# Altium PCB PCB-Powermodule-v11.0.0.PcbDoc (part 3 of 5)
Units mil, origin at the board's own origin, x right, y up, seen from the top; angles counter-clockwise.
Board outline 3031.5 x 1495.87 mil, 4 copper layers (Top Layer, Ground, Power, Bottom Layer), stack 61.653 mil thick; 227 components, 160 nets, 893 pads, 326 vias.
Unrouted connection lines stored in the file: 45.
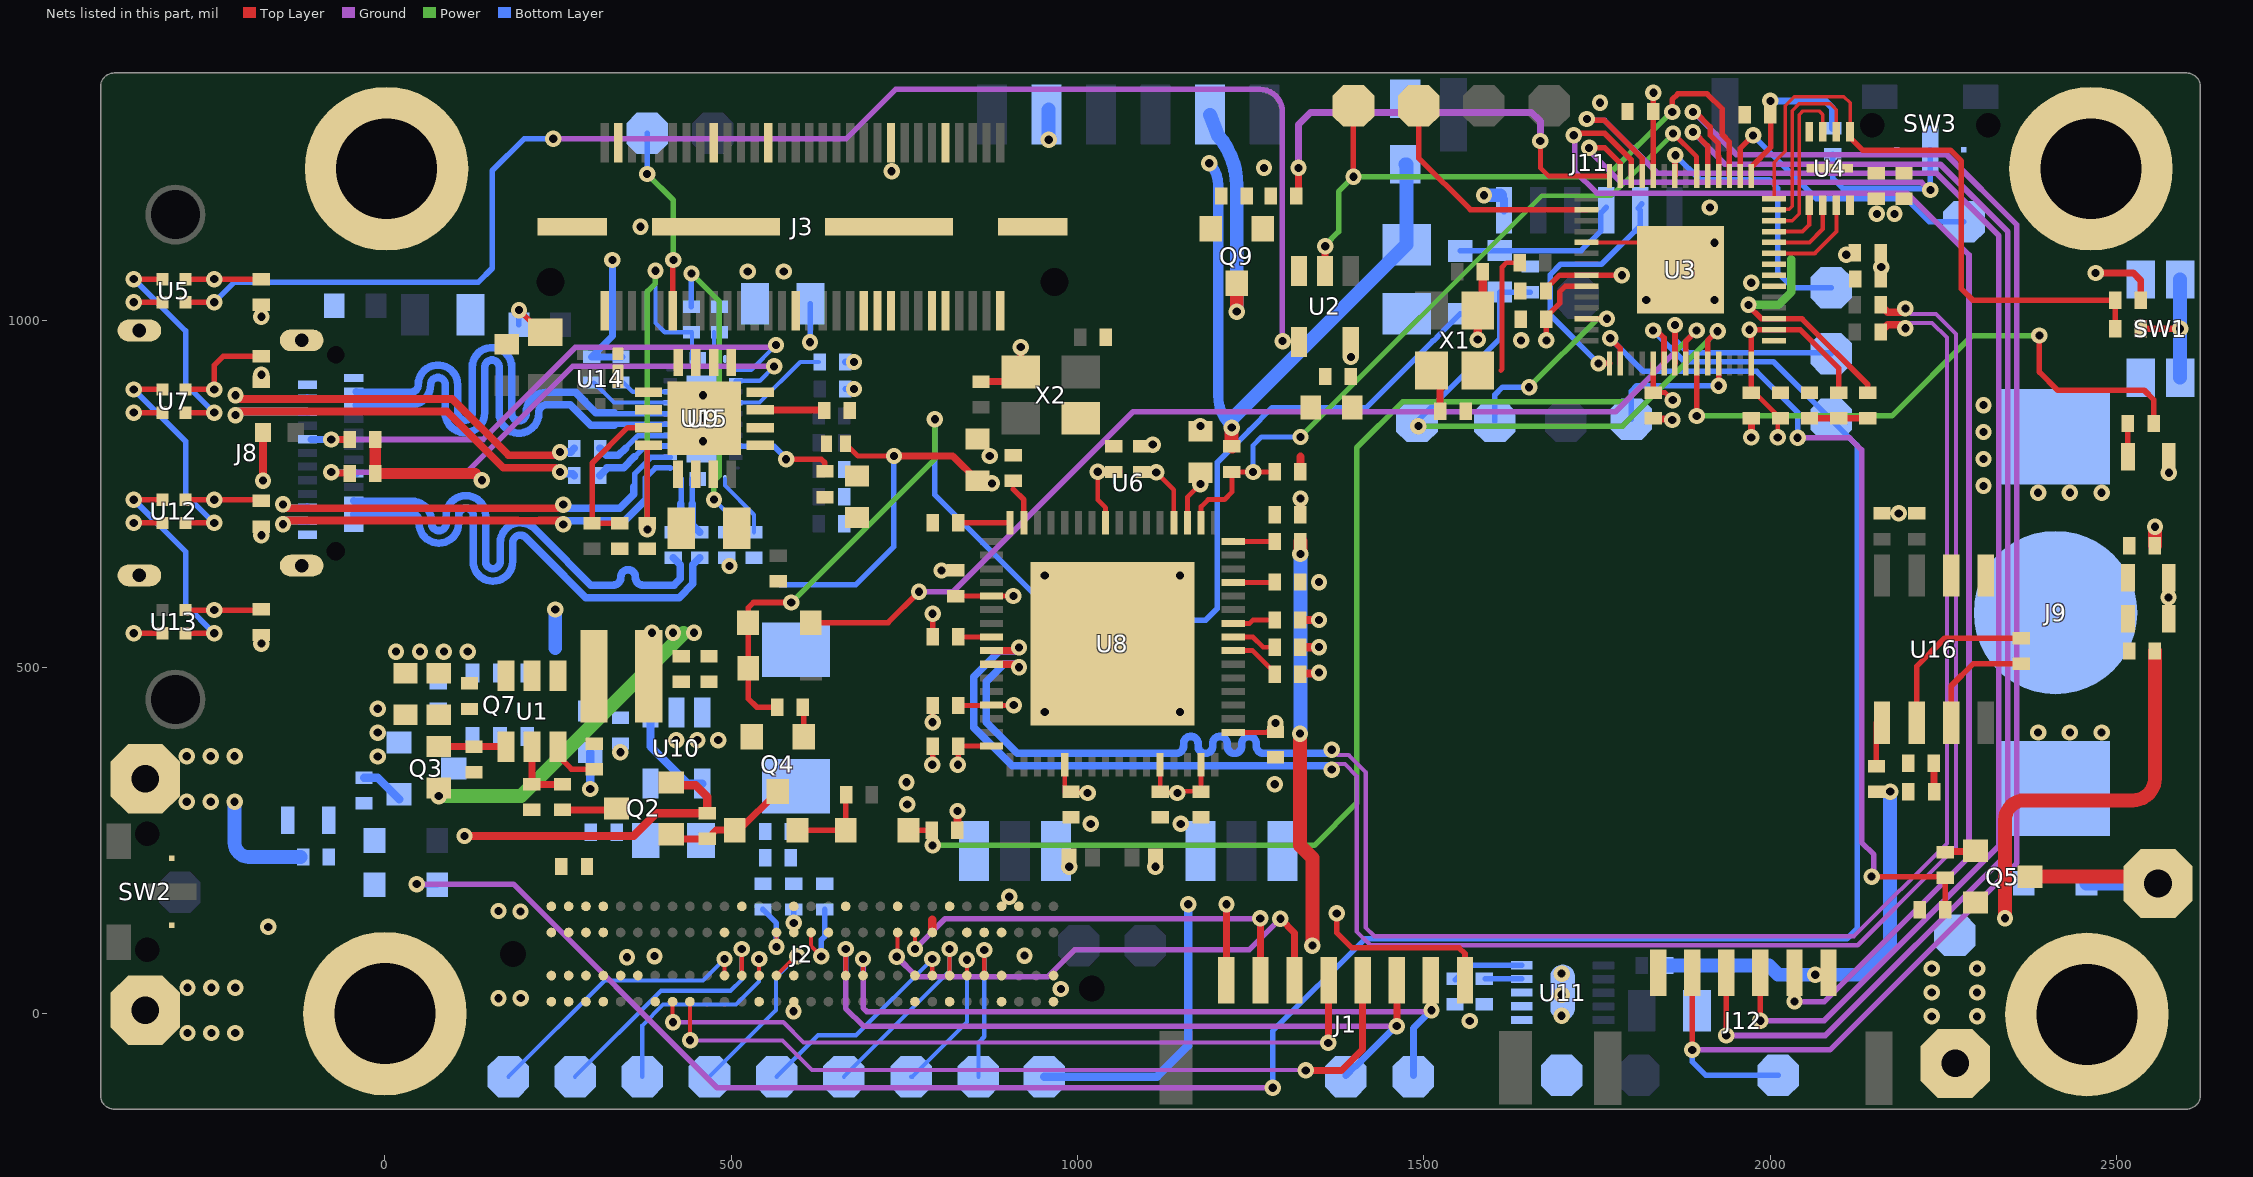
[diagram p4: the nets of this part, all layers, seen from the top]

## Part data (continued)
R9 R19 R22 R31 R32 R33: library part CRCW04021K00FKEDHP, "RES SMD 1K OHM 1% 1/5W 0402", Case Code (Imperial)=0402, Case Code (Metric)=1005, LCSC Part Number=C313354, Manufacturer="Vishay Dale", Max Operating Temperature=155°C, Max Power Dissipation=125mW, Min Operating Temperature=-55°C, Package Quantity=10, Resistance=1kR, Resistance Tolerance=1%, Resistor Type="Thick Film", Supplier Part Number 1=541-1.00KYCT-ND, Temperature Coefficient=100ppm/°C, Voltage Rating=50V, Case/Package=0402, ComponentLink1Description=http://www.farnell.com/datasheets/2339608.pdf?src-supplier=Element14, ComponentLink1URL=http://www.farnell.com/datasheets/2339608.pdf?src-supplier=Element14, ComponentLink2Description=http://www.vishay.com/docs/20043/crcwhpe3.pdf?src-supplier=Digi-Key, ComponentLink2URL=http://www.vishay.com/docs/20043/crcwhpe3.pdf?src-supplier=Digi-Key, ComponentLink3Description=http://www.mouser.com/ds/2/427/crcwhpe3-46056.pdf?src-supplier=Mouser, ComponentLink3URL=http://www.mouser.com/ds/2/427/crcwhpe3-46056.pdf?src-supplier=Mouser, ComponentLink4Description=http://www.vishay.com/docs/20043/crcwhpe3.pdf?src-supplier=Avnet, ComponentLink4URL=http://www.vishay.com/docs/20043/crcwhpe3.pdf?src-supplier=Avnet, ComponentLink5Description=http://www.vishay.com/docs/20043/crcwhpe3.pdf?src-supplier=Future+Electronics, ComponentLink5URL=http://www.vishay.com/docs/20043/crcwhpe3.pdf?src-supplier=Future+Electronics, Construction=Rectangular, Contact Plating=Tin, Depth=0.5mm, Features="Automotive AEC-Q200", Height=0.3mm, Lead Free="Lead Free", Length=1mm, Manufacturer Part Number=CRCW04021K00FKEDHP, Military Standard=Not, Mount="Surface Mount", Number of Pins=2, Number of Terminations=2, Packaging="Tape and Reel", Power Rating=125mW, Pricing 1="1=0.15, 10=0.132, 100=0.0506, 1000=0.02226, 2500=0.01923, 5000=0.0172 (USD)", Radiation Hardening=No, REACH SVHC=Unknown, RoHS Compliant=Yes, Series=CRCW-HP, Size Code=0402, Stock 1=315989, Supplier 1=Digi-Key, Technology="THICK FILM", Termination=SMD/SMT, Tolerance=1%, Voltage Rating (DC)=50V, Weight=2.3E-05oz, Width=0.5mm
R14 R15 R23 R24 R57: library part RC0402FR-074K7L, "RES 4.7K OHM 1% 1/16W 0402", Case Code (Imperial)=0402, Case Code (Metric)=1005, LCSC Part Number=C105871, Manufacturer=Yageo, Max Operating Temperature=155°C, Max Power Dissipation=63mW, Min Operating Temperature=-55°C, Power Rating=62.5mW, Resistance=4.7kR, Resistance Tolerance=1%, Resistor Type="Thick Film", Temperature Coefficient=100ppm/°C, Voltage Rating=50V, Case/Package=0402, Category="Chip SMD Resistors", ComponentLink1Description=https://datasheet.ciiva.com/22661/1686128-22661342.pdf?src-supplier=Element14, ComponentLink1URL=https://datasheet.ciiva.com/22661/1686128-22661342.pdf?src-supplier=Element14, ComponentLink2Description=https://datasheet.ciiva.com/7850/1018594-7850022.pdf?src-supplier=Element14, ComponentLink2URL=https://datasheet.ciiva.com/7850/1018594-7850022.pdf?src-supplier=Element14, ComponentLink3Description=https://datasheet.ciiva.com/7850/1018594-7850023.pdf?src-supplier=Element14, ComponentLink3URL=https://datasheet.ciiva.com/7850/1018594-7850023.pdf?src-supplier=Element14, ComponentLink4Description=https://datasheet.ciiva.com/15215/getdatasheetpartid-328119-15215035.pdf?src-supplier=Verical, ComponentLink4URL=https://datasheet.ciiva.com/15215/getdatasheetpartid-328119-15215035.pdf?src-supplier=Verical, Construction=Rectangular, Depth=0.5mm, Features="Moisture Resistant", Height=0.32mm, Height - Seated (Max)=0.016inch, Item Type=Resistor, Lead Free="Lead Free", Length=1mm, Manufacturer Part Number=RC0402FR-074K7L, Military Standard=Not, Number of Pins=2, Number of Terminations=2, Packaging="Tape and Reel", Pricing 1="10000=0.00085 (USD)", Reach SVHC Compliant=Yes, RoHS=Yes, RoHS Compliant=Yes, Series=RC, Size Code=0402, Stock 1=2420000, Supplier 1=Avnet, Supplier Part Number 1=RC0402FR-074K7L, Termination=SMD/SMT, Tolerance=1%, Voltage Rating (DC)=50V, Width=0.5mm
R18 R20: library part CRGCQ0402F27R, "SMD Chip Resistor, 27 Ohm, ± 1%, 63 mW, 0402 [1005 Metric], Thick Film, General Purpose", Manufacturer="TE Connectivity", Operating Supply Voltage=50V, Power Rating=62.5mW, Supplier Part Number=A129608CT-ND, Category="Chip SMD Resistors", ComponentLink1Description=http://datasheet.octopart.com/CRGCQ0402F27R-TE-Connectivity-datasheet-114679081.pdf?src-supplier=Farnell, ComponentLink1URL=http://datasheet.octopart.com/CRGCQ0402F27R-TE-Connectivity-datasheet-114679081.pdf?src-supplier=Farnell, ComponentLink2Description=http://datasheet.octopart.com/CRGCQ0402F27R-TE-Connectivity-datasheet-114679081.pdf?src-supplier=Mouser, ComponentLink2URL=http://datasheet.octopart.com/CRGCQ0402F27R-TE-Connectivity-datasheet-114679081.pdf?src-supplier=Mouser, ComponentLink3Description=http://datasheet.octopart.com/CRGCQ0402F27R-TE-Connectivity-datasheet-114679081.pdf?src-supplier=Avnet, ComponentLink3URL=http://datasheet.octopart.com/CRGCQ0402F27R-TE-Connectivity-datasheet-114679081.pdf?src-supplier=Avnet, ComponentLink4Description=https://www.te.com/commerce/DocumentDelivery/DDEController?Action=srchrtrv&amp;DocNm=1773204-3&amp;DocType=DS&amp;DocLang=English&src-supplier=Digikey, ComponentLink4URL=https://www.te.com/commerce/DocumentDelivery/DDEController?Action=srchrtrv&amp;DocNm=1773204-3&amp;DocType=DS&amp;DocLang=English&src-supplier=Digikey, ComponentLink5Description=http://datasheet.octopart.com/CRGCQ0402F27R-TE-Connectivity-datasheet-114679081.pdf?src-supplier=Digikey, ComponentLink5URL=http://datasheet.octopart.com/CRGCQ0402F27R-TE-Connectivity-datasheet-114679081.pdf?src-supplier=Digikey, ComponentLink6Description=http://datasheet.octopart.com/CRGCQ0402F27R-TE-Connectivity-datasheet-114679081.pdf?src-supplier=Newark, ComponentLink6URL=http://datasheet.octopart.com/CRGCQ0402F27R-TE-Connectivity-datasheet-114679081.pdf?src-supplier=Newark, ComponentLink7Description=http://datasheet.octopart.com/CRGCQ0402F27R-TE-Connectivity-datasheet-114679081.pdf?src-supplier=Verical, ComponentLink7URL=http://datasheet.octopart.com/CRGCQ0402F27R-TE-Connectivity-datasheet-114679081.pdf?src-supplier=Verical, ComponentLink8Description=http://datasheet.octopart.com/CRGCQ0402F27R-TE-Connectivity-datasheet-114679081.pdf?src-supplier=Arrow+Electronics, ComponentLink8URL=http://datasheet.octopart.com/CRGCQ0402F27R-TE-Connectivity-datasheet-114679081.pdf?src-supplier=Arrow+Electronics, ComponentLink9Description=http://datasheet.octopart.com/CRGCQ0402F27R-TE-Connectivity-datasheet-114679081.pdf?src-supplier=Onlinecomponents.com, ComponentLink9URL=http://datasheet.octopart.com/CRGCQ0402F27R-TE-Connectivity-datasheet-114679081.pdf?src-supplier=Onlinecomponents.com, ComponentLink10Description=http://datasheet.octopart.com/CRGCQ0402F27R-TE-Connectivity-datasheet-114679081.pdf?src-supplier=Sager+Electronics, ComponentLink10URL=http://datasheet.octopart.com/CRGCQ0402F27R-TE-Connectivity-datasheet-114679081.pdf?src-supplier=Sager+Electronics, ComponentLink11Description=http://datasheet.octopart.com/CRGCQ0402F27R-TE-Connectivity-datasheet-114679081.pdf?src-supplier=Electro+Sonic, ComponentLink11URL=http://datasheet.octopart.com/CRGCQ0402F27R-TE-Connectivity-datasheet-114679081.pdf?src-supplier=Electro+Sonic, ComponentLink12Description=http://datasheet.octopart.com/CRGCQ0402F27R-TE-Connectivity-datasheet-114679081.pdf?src-supplier=Heilind+Electronics, ComponentLink12URL=http://datasheet.octopart.com/CRGCQ0402F27R-TE-Connectivity-datasheet-114679081.pdf?src-supplier=Heilind+Electronics, ComponentLink13Description=http://datasheet.octopart.com/CRGCQ0402F27R-TE-Connectivity-datasheet-114679081.pdf?src-supplier=Interstate+Connecting+Components, ComponentLink13URL=http://datasheet.octopart.com/CRGCQ0402F27R-TE-Connectivity-datasheet-114679081.pdf?src-supplier=Interstate+Connecting+Components, ComponentLink14Description=https://datasheet.octopart.com/CRGCQ0402F27R-TE-Connectivity-datasheet-114679081.pdf?src-supplier=Master+Electronics, ComponentLink14URL=https://datasheet.octopart.com/CRGCQ0402F27R-TE-Connectivity-datasheet-114679081.pdf?src-supplier=Master+Electronics, ComponentLink15Description=http://datasheet.octopart.com/CRGCQ0402F27R-TE-Connectivity-datasheet-114679081.pdf?src-supplier=TME, ComponentLink15URL=http://datasheet.octopart.com/CRGCQ0402F27R-TE-Connectivity-datasheet-114679081.pdf?src-supplier=TME, Height=400um, Manufacturer Part Number=CRGCQ0402F27R, Pricing="1=0.1, 10=0.02, 50=0.0126, 100=0.0105, 500=0.00708, 1000=0.00609, 5000=0.00442 (USD)", RoHS=Yes, Stock=81404, Supplier=Digikey, Voltage Rating=50V, Voltage Rating (DC)=50V
R27 R28: library part RC0402FR-0756KL, "RES 56K OHM 1% 1/16W 0402", Case Code (Imperial)=0402, Case Code (Metric)=1005, LCSC Part Number=C114756, Manufacturer=Yageo, Max Operating Temperature=155°C, Max Power Dissipation=63mW, Min Operating Temperature=-55°C, Package Quantity=1, Power Rating=62.5mW, Resistance Tolerance=1%, Resistor Type="Thick Film", Supplier Part Number 1=3873767, Temperature Coefficient=100ppm/°C, Voltage Rating=50V, Case/Package=0402, Category="Chip SMD Resistors", ComponentLink1Description=https://datasheet.ciiva.com/46412/1018594-46412840.pdf?src-supplier=Element14, ComponentLink1URL=https://datasheet.ciiva.com/46412/1018594-46412840.pdf?src-supplier=Element14, ComponentLink2Description=https://datasheet.ciiva.com/2453/pyu-r-int-thick-7-2453479.pdf?src-supplier=Digi-Key, ComponentLink2URL=https://datasheet.ciiva.com/2453/pyu-r-int-thick-7-2453479.pdf?src-supplier=Digi-Key, ComponentLink3Description=https://datasheet.ciiva.com/2453/pyu-r-int-thick-7-2453480.pdf?src-supplier=Digi-Key, ComponentLink3URL=https://datasheet.ciiva.com/2453/pyu-r-int-thick-7-2453480.pdf?src-supplier=Digi-Key, ComponentLink4Description=https://datasheet.ciiva.com/2453/pyu-r-int-thick-7-2453478.pdf?src-supplier=Digi-Key, ComponentLink4URL=https://datasheet.ciiva.com/2453/pyu-r-int-thick-7-2453478.pdf?src-supplier=Digi-Key, ComponentLink5Description=https://datasheet.ciiva.com/5558/pyu-rc0402-51-rohs-l-6-r-5558279.pdf?src-supplier=Mouser, ComponentLink5URL=https://datasheet.ciiva.com/5558/pyu-rc0402-51-rohs-l-6-r-5558279.pdf?src-supplier=Mouser, ComponentLink6Description=https://datasheet.ciiva.com/7850/1018594-7850045.pdf?src-supplier=Element14, ComponentLink6URL=https://datasheet.ciiva.com/7850/1018594-7850045.pdf?src-supplier=Element14, ComponentLink7Description=https://datasheet.ciiva.com/7850/1018594-7850044.pdf?src-supplier=Element14, ComponentLink7URL=https://datasheet.ciiva.com/7850/1018594-7850044.pdf?src-supplier=Element14, Construction=Rectangular, Depth=0.5mm, Features="Moisture Resistant", Height=0.016inch, Item Type=Resistor, Lead Free="Lead Free", Length=0.039inch, Manufacturer Part Number=RC0402FR-0756KL, Military Standard=Not, Number of Terminations=2, Packaging="Tape and Reel", Pricing 1="10000=0.001, 50000=0.001, 300000=0.0009, 1000000=0.0009, 3000000=0.0008 (USD)", Reach SVHC Compliant=No, RoHS=Yes, RoHS Compliant=Yes, Series=RC, Stock 1=2610000, Supplier 1="Future Electronics", Technology="THICK FILM", Termination=SMD/SMT, Tolerance=1%, Width=0.02inch, Working Voltage=50V
R36: library part RC0603FR-0720KL, "RES 20K OHM 1% 1/10W 0603", Case Code (Imperial)=0603, Case Code (Metric)=1608, LCSC Part Number=C105575, Manufacturer=Yageo, Max Operating Temperature=155°C, Max Power Dissipation=100mW, Min Operating Temperature=-55°C, Package Quantity=1, Resistance=20kR, Resistance Tolerance=1%, Resistor Type="Thick Film", Temperature Coefficient=100ppm/°C, Voltage Rating=50V, Case/Package=0603, Category="Chip SMD Resistors", ComponentLink1Description=https://datasheet.ciiva.com/11808/0900766b80f96399-11808275.pdf?src-supplier=RSComponents, ComponentLink1URL=https://datasheet.ciiva.com/11808/0900766b80f96399-11808275.pdf?src-supplier=RSComponents, ComponentLink2Description=https://datasheet.ciiva.com/22747/443971-22747525.pdf?src-supplier=Element14, ComponentLink2URL=https://datasheet.ciiva.com/22747/443971-22747525.pdf?src-supplier=Element14, ComponentLink3Description=https://datasheet.ciiva.com/2453/pyu-r-int-thick-7-2453911.pdf?src-supplier=Digi-Key, ComponentLink3URL=https://datasheet.ciiva.com/2453/pyu-r-int-thick-7-2453911.pdf?src-supplier=Digi-Key, ComponentLink4Description=https://datasheet.ciiva.com/2453/pyu-r-int-thick-7-2453912.pdf?src-supplier=Digi-Key, ComponentLink4URL=https://datasheet.ciiva.com/2453/pyu-r-int-thick-7-2453912.pdf?src-supplier=Digi-Key, ComponentLink5Description=https://datasheet.ciiva.com/2453/pyu-r-int-thick-7-2453910.pdf?src-supplier=Digi-Key, ComponentLink5URL=https://datasheet.ciiva.com/2453/pyu-r-int-thick-7-2453910.pdf?src-supplier=Digi-Key, Construction=Rectangular, Depth=0.8mm, Features="Moisture Resistant", Height=0.022inch, Item Type=Resistor, Lead Free="Lead Free", Length=0.063inch, Manufacturer Part Number=RC0603FR-0720KL, Military Standard=Not, Number of Pins=2, Number of Terminations=2, Packaging="Tape and Reel", Power Rating=100mW, Pricing 1="5000=0.00240, 10000=0.00220, 25000=0.00200, 50000=0.00190, 125000=0.00180 (USD)", REACH SVHC="No SVHC", RoHS=Yes, RoHS Compliant=Yes, Series=RC, Size Code=0603, Stock 1=945000, Supplier 1="Arrow Electronics", Supplier Part Number 1=RC0603FR-0720KL, Technology="THICK FILM", Termination=SMD/SMT, Tolerance=1%, Voltage Rating (DC)=50V, Width=0.031inch
R43: library part RC0402FR-07100RL, "RES 100 OHM 1% 1/16W 0402", Case Code (Imperial)=0402, Case Code (Metric)=1005, LCSC Part Number=C106232, Manufacturer=Yageo, Max Operating Temperature=155°C, Max Power Dissipation=63mW, Min Operating Temperature=-55°C, Power Rating=62.5mW, Resistance Tolerance=1%, Resistor Type="Thick Film", Supplier Part Number 1=603-RC0402FR-07100RL, Temperature Coefficient=100ppm/°C, Voltage Rating=50V, Case/Package=0402, Category="Chip SMD Resistors", ComponentLink1Description=https://datasheet.ciiva.com/11808/0900766b80c66297-11808765.pdf?src-supplier=RSComponents, ComponentLink1URL=https://datasheet.ciiva.com/11808/0900766b80c66297-11808765.pdf?src-supplier=RSComponents, ComponentLink2Description=https://datasheet.ciiva.com/7849/1784430-7849810.pdf?src-supplier=Element14, ComponentLink2URL=https://datasheet.ciiva.com/7849/1784430-7849810.pdf?src-supplier=Element14, ComponentLink3Description=https://datasheet.ciiva.com/28367/1018594-28367226.pdf?src-supplier=Element14, ComponentLink3URL=https://datasheet.ciiva.com/28367/1018594-28367226.pdf?src-supplier=Element14, ComponentLink4Description=https://datasheet.ciiva.com/22747/1018594-22747511.pdf?src-supplier=Element14, ComponentLink4URL=https://datasheet.ciiva.com/22747/1018594-22747511.pdf?src-supplier=Element14, ComponentLink5Description=https://datasheet.ciiva.com/12667/pyu-rc0402-51-rohs-l-6-r-12667957.pdf?src-supplier=Mouser, ComponentLink5URL=https://datasheet.ciiva.com/12667/pyu-rc0402-51-rohs-l-6-r-12667957.pdf?src-supplier=Mouser, ComponentLink6Description=https://datasheet.ciiva.com/15189/getdatasheetpartid-329466-15189335.pdf?src-supplier=Verical, ComponentLink6URL=https://datasheet.ciiva.com/15189/getdatasheetpartid-329466-15189335.pdf?src-supplier=Verical, ComponentLink7Description=https://datasheet.ciiva.com/16740/pyu-rc0402-51-rohs-l-6-r-16740566.pdf?src-supplier=Future+Electronics, ComponentLink7URL=https://datasheet.ciiva.com/16740/pyu-rc0402-51-rohs-l-6-r-16740566.pdf?src-supplier=Future+Electronics, Construction=Rectangular, Depth=0.5mm, Features="Moisture Resistant", Height=0.32mm, Item Type=Resistor, Lead Free="Lead Free", Length=1mm, Manufacturer Part Number=RC0402FR-07100RL, Military Standard=Not, Number of Pins=2, Number of Terminations=2, Packaging="Tape and Reel", Pricing 1="1=0.10000, 10=0.01200, 50=0.01200, 100=0.00500, 1000=0.00300, 2500=0.00200, 10000=0.00100 (USD)", REACH SVHC="No SVHC", Resistance=100R, RoHS=Yes, RoHS Compliant=Yes, Series=RC, Size Code=0402, Stock 1=699545, Supplier 1=Mouser, Technology="THICK FILM", Termination=SMD/SMT, Tolerance=1%, Voltage Rating (DC)=50V, Width=0.5mm
R45: library part RC0402FR-079K1L, "RES 9.1K OHM 1% 1/16W 0402", Case Code (Imperial)=0402, Case Code (Metric)=1005, LCSC Part Number=C163450, Manufacturer=Yageo, Max Operating Temperature=155°C, Max Power Dissipation=63mW, Min Operating Temperature=-55°C, Package Quantity=1, Resistance Tolerance=1%, Resistor Type="Thick Film", Supplier Part Number=8081614, Temperature Coefficient=100ppm/°C, Voltage Rating=50V, Case/Package=0402, Category="Chip SMD Resistors", ComponentLink1Description=https://datasheet.ciiva.com/7850/1018594-7850124.pdf?src-supplier=Element14, ComponentLink1URL=https://datasheet.ciiva.com/7850/1018594-7850124.pdf?src-supplier=Element14, ComponentLink2Description=https://datasheet.ciiva.com/7850/1018594-7850123.pdf?src-supplier=Element14, ComponentLink2URL=https://datasheet.ciiva.com/7850/1018594-7850123.pdf?src-supplier=Element14, ComponentLink3Description=https://datasheet.ciiva.com/2491/pyu-r-int-thick-7-2491238.pdf?src-supplier=Digikey, ComponentLink3URL=https://datasheet.ciiva.com/2491/pyu-r-int-thick-7-2491238.pdf?src-supplier=Digikey, ComponentLink4Description=https://datasheet.ciiva.com/2491/pyu-r-int-thick-7-2491239.pdf?src-supplier=Digikey, ComponentLink4URL=https://datasheet.ciiva.com/2491/pyu-r-int-thick-7-2491239.pdf?src-supplier=Digikey, ComponentLink5Description=https://datasheet.ciiva.com/8891/pyu-rc0402-51-rohs-l-6-8891518.pdf?src-supplier=Avnet, ComponentLink5URL=https://datasheet.ciiva.com/8891/pyu-rc0402-51-rohs-l-6-8891518.pdf?src-supplier=Avnet, ComponentLink6Description=https://datasheet.ciiva.com/17068/pyu-rc0402-51-rohs-l-6-r-17068454.pdf?src-supplier=Future+Electronics, ComponentLink6URL=https://datasheet.ciiva.com/17068/pyu-rc0402-51-rohs-l-6-r-17068454.pdf?src-supplier=Future+Electronics, ComponentLink7Description=https://datasheet.ciiva.com/2491/pyu-r-int-thick-7-2491237.pdf?src-supplier=Digikey, ComponentLink7URL=https://datasheet.ciiva.com/2491/pyu-r-int-thick-7-2491237.pdf?src-supplier=Digikey, Construction=Rectangular, Contact Plating=Tin,Matte, Depth=0.5mm, Features="Moisture Resistant", Height=0.016inch, Item Type=Resistor, Lead Free=5697LeadFree, Length=1mm, Manufacturer Part Number=RC0402FR-079K1L, Military Standard=Not, Number of Terminations=2, Packaging="Tape and Reel", Power Rating=63mW, Pricing="10000=0.0012, 100000=0.0011, 300000=0.001, 750000=0.001, 2000000=0.0009 (USD)", Reach SVHC Compliant=Unknown, RoHS=Yes, RoHS Compliant=Yes, Series=RC, Stock=70000, Supplier="Future Electronics", Termination=SMD/SMT, Tolerance=1%, Voltage Rating (DC)=50V, Width=0.02inch
R46 R49 R50 R68: library part RC0402FR-07200KL, "RES 200K OHM 1% 1/16W 0402", Case Code (Imperial)=0402, Case Code (Metric)=1005, LCSC Part Number=C114763, Manufacturer=Yageo, Max Operating Temperature=155°C, Max Power Dissipation=63mW, Min Operating Temperature=-55°C, Package Quantity=1, Resistance Tolerance=1%, Resistor Type="Thick Film", Temperature Coefficient=100ppm/°C, Voltage Rating=50V, Case/Package=0402, ComponentLink1Description=https://datasheet.ciiva.com/7849/1018594-7849897.pdf?src-supplier=Element14, ComponentLink1URL=https://datasheet.ciiva.com/7849/1018594-7849897.pdf?src-supplier=Element14, ComponentLink2Description=https://datasheet.ciiva.com/7849/1018594-7849896.pdf?src-supplier=Element14, ComponentLink2URL=https://datasheet.ciiva.com/7849/1018594-7849896.pdf?src-supplier=Element14, ComponentLink3Description=https://datasheet.ciiva.com/46394/1018594-46394953.pdf?src-supplier=Element14, ComponentLink3URL=https://datasheet.ciiva.com/46394/1018594-46394953.pdf?src-supplier=Element14, ComponentLink4Description=https://datasheet.ciiva.com/2453/pyu-r-int-thick-7-2453557.pdf?src-supplier=Digikey, ComponentLink4URL=https://datasheet.ciiva.com/2453/pyu-r-int-thick-7-2453557.pdf?src-supplier=Digikey, ComponentLink5Description=https://datasheet.ciiva.com/2453/pyu-r-int-thick-7-2453558.pdf?src-supplier=Digikey, ComponentLink5URL=https://datasheet.ciiva.com/2453/pyu-r-int-thick-7-2453558.pdf?src-supplier=Digikey, ComponentLink6Description=https://datasheet.ciiva.com/2453/pyu-r-int-thick-7-2453556.pdf?src-supplier=Digikey, ComponentLink6URL=https://datasheet.ciiva.com/2453/pyu-r-int-thick-7-2453556.pdf?src-supplier=Digikey, ComponentLink7Description=https://datasheet.ciiva.com/12667/pyu-rc0402-51-rohs-l-6-r-12667911.pdf?src-supplier=Mouser, ComponentLink7URL=https://datasheet.ciiva.com/12667/pyu-rc0402-51-rohs-l-6-r-12667911.pdf?src-supplier=Mouser, ComponentLink8Description=https://datasheet.ciiva.com/15189/getdatasheetpartid-323720-15189381.pdf?src-supplier=Verical, ComponentLink8URL=https://datasheet.ciiva.com/15189/getdatasheetpartid-323720-15189381.pdf?src-supplier=Verical, ComponentLink9Description=https://datasheet.ciiva.com/16740/pyu-rc0402-51-rohs-l-6-r-16740636.pdf?src-supplier=Future+Electronics, ComponentLink9URL=https://datasheet.ciiva.com/16740/pyu-rc0402-51-rohs-l-6-r-16740636.pdf?src-supplier=Future+Electronics, Construction=Rectangular, Depth=0.5mm, Features="Moisture Resistant", Height=0.016inch, Item Type=Resistor, Lead Free=5697LeadFree, Length=0.039inch, Manufacturer Part Number=RC0402FR-07200KL, Military Standard=Not, Number of Terminations=2, Packaging="Tape and Reel", Power Rating=63mW, Pricing="10000=0.0004, 50000=0.0008, 150000=0.0004, 300000=0.0007, 400000=0.0004, 1000000=0.0004, 2500000=0.0004, 3000000=0.0006 (USD)", Reach SVHC Compliant=Unknown, RoHS=Yes, RoHS Compliant=Yes, Series=RC, Stock=290000, Supplier="Future Electronics", Technology="THICK FILM", Termination=SMD/SMT, Tolerance=1%, Voltage Rating (DC)=50V, Width=0.02inch, Working Voltage=50V
R51: library part RT0402BRD07150KL, "RES 150K OHM 0.1% 1/16W 0402", LCSC Part Number=C852538, Manufacturer=Yageo, Supplier Part Number=3102901, Category="Chip SMD Resistors", Item Type=Resistor, Manufacturer Part Number=RT0402BRD07150KL, Pricing="10000=0.0218, 20000=0.0213, 30000=0.021, 50000=0.0206, 100000=0.0199 (USD)", RoHS=Yes, RoHS Compliant=Yes, Stock=20000, Supplier="Future Electronics"
R52: library part AT0402DRD0790K9L, "RES SMD 90.9KOHM 0.5% 1/16W 0402", Case/Package=0402, LCSC Part Number=C851529, Manufacturer=Yageo, Max Operating Temperature=155°C, Max Power Dissipation=63mW, Min Operating Temperature=-55°C, Temperature Coefficient=25ppm/°C, Tolerance=0.5%, ComponentLink1Description=http://www.yageo.com/documents/recent/PYu-AT_51_RoHS_L-3.pdf?src-supplier=Digikey, ComponentLink1URL=http://www.yageo.com/documents/recent/PYu-AT_51_RoHS_L-3.pdf?src-supplier=Digikey, Features="Moisture Resistant,Automotive AEC-Q200,Anti-Sulfur", Height=0.014inch, Item Type=Resistor, Length=0.039inch, Manufacturer Part Number=AT0402DRD0790K9L, Number of Terminations=2, Packaging="Tape and Reel", Pricing="10000=0.03114 (USD)", RoHS=Yes, RoHS Compliant=Yes, Series=AT, Supplier=Digikey, Width=0.02inch
R55: library part RC0603FR-071ML, "RES SMD 1M OHM 1% 1/10W 0603", Case Code (Imperial)=0603, Case Code (Metric)=1608, LCSC Part Number=C105578, Manufacturer=Yageo, Max Operating Temperature=155°C, Min Operating Temperature=-55°C, Package Quantity=5000, Power Rating=100mW, Resistance=1MR, Supplier Part Number 1=311-1.00MHRDKR-ND, Temperature Coefficient=100ppm/°C, Tolerance=1%, Voltage Rating=50V, Case/Package=0603, ComponentLink1Description=http://www.farnell.com/datasheets/2167052.pdf?src-supplier=Mouser, ComponentLink1URL=http://www.farnell.com/datasheets/2167052.pdf?src-supplier=Mouser, ComponentLink2Description=http://www.farnell.com/datasheets/2167052.pdf?src-supplier=Element14, ComponentLink2URL=http://www.farnell.com/datasheets/2167052.pdf?src-supplier=Element14, ComponentLink3Description=http://documents.rs-components.com/techlib://itc_doclist_GB.htm?stockno=5048956&src-supplier=RSComponents, ComponentLink3URL=http://documents.rs-components.com/techlib://itc_doclist_GB.htm?stockno=5048956&src-supplier=RSComponents, Composition="Thick Film", Depth=0.8mm, Height=0.45mm, Item Type=Resistor, Lead Free="Lead Free", Length=1.6mm, Manufacturer Part Number=RC0603FR-071ML, Military Standard=Not, Number of Pins=2, Packaging="Tape and Reel", Pricing 1="1=0.1, 10=0.023, 100=0.0094, 1000=0.00421, 2500=0.00366 (USD)", REACH SVHC="No SVHC", Stock 1=3824601, Supplier 1=Digi-Key, Termination=SMD/SMT, Voltage Rating (DC)=50V, Width=0.8mm
R56 R58 R74: library part RC0402FR-070RL, "RES 0 OHM JUMPER 1/16W 0402", Case Code (Imperial)=0402, Case Code (Metric)=1005, LCSC Part Number=C106231, Manufacturer=Yageo, Max Operating Temperature=155°C, Max Power Dissipation=63mW, Min Operating Temperature=-55°C, Power Rating=62.5mW, Resistor Type="Thick Film", Supplier Part Number 1=603-RC0402FR-070RL, Temperature Coefficient=200ppm/°C, Tolerance=1%, Voltage Rating=50V, Case/Package=0402, ComponentLink1Description=https://datasheet.ciiva.com/8896/pyu-rc0402-51-rohs-l-6-8896149.pdf?src-supplier=Avnet, ComponentLink1URL=https://datasheet.ciiva.com/8896/pyu-rc0402-51-rohs-l-6-8896149.pdf?src-supplier=Avnet, ComponentLink2Description=https://datasheet.ciiva.com/16790/pyu-rc0402-51-rohs-l-6-r-16790444.pdf?src-supplier=Future+Electronics, ComponentLink2URL=https://datasheet.ciiva.com/16790/pyu-rc0402-51-rohs-l-6-r-16790444.pdf?src-supplier=Future+Electronics, Contact Plating=Tin,Matte, Features="Moisture Resistant", Height=0.35mm, Item Type=Resistors, Lead Free="Lead Free", Length=1mm, Manufacturer Part Number=RC0402FR-070RL, Mount="Surface Mount", Number of Terminations=2, Packaging="Tape and Reel", Pricing 1="1=0.10000, 10=0.01400, 50=0.01400, 100=0.00600, 1000=0.00300, 5000=0.00200, 10000=0.00100 (USD)", Radiation Hardening=No, Resistance=0R, RoHS=Yes, RoHS Compliant=Yes, Series=RC, Size Code=0402, Stock 1=8556842, Supplier 1=Mouser, Termination=SMD/SMT, Width=0.5mm
R62: library part RC0402FR-070RL, "RES 0 OHM JUMPER 1/16W 0402", Case Code (Imperial)=0402, Case Code (Metric)=1005, LCSC Part Number=C106231, Manufacturer=Yageo, Max Operating Temperature=155°C, Max Power Dissipation=63mW, Min Operating Temperature=-55°C, Power Rating=62.5mW, Resistance=0R, Resistor Type="Thick Film", Supplier Part Number 1=603-RC0402FR-070RL, Temperature Coefficient=200ppm/°C, Tolerance=1%, Voltage Rating=50V, Case/Package=0402, ComponentLink1Description=https://datasheet.ciiva.com/8896/pyu-rc0402-51-rohs-l-6-8896149.pdf?src-supplier=Avnet, ComponentLink1URL=https://datasheet.ciiva.com/8896/pyu-rc0402-51-rohs-l-6-8896149.pdf?src-supplier=Avnet, ComponentLink2Description=https://datasheet.ciiva.com/16790/pyu-rc0402-51-rohs-l-6-r-16790444.pdf?src-supplier=Future+Electronics, ComponentLink2URL=https://datasheet.ciiva.com/16790/pyu-rc0402-51-rohs-l-6-r-16790444.pdf?src-supplier=Future+Electronics, Contact Plating=Tin,Matte, Features="Moisture Resistant", Height=0.35mm, Item Type=Resistors, Lead Free="Lead Free", Length=1mm, Manufacturer Part Number=RC0402FR-070RL, Mount="Surface Mount", Number of Terminations=2, Packaging="Tape and Reel", Pricing 1="1=0.10000, 10=0.01400, 50=0.01400, 100=0.00600, 1000=0.00300, 5000=0.00200, 10000=0.00100 (USD)", Radiation Hardening=No, RoHS=Yes, RoHS Compliant=Yes, Series=RC, Size Code=0402, Stock 1=8556842, Supplier 1=Mouser, Termination=SMD/SMT, Width=0.5mm
R63: library part AR03BTC5003N, "62.5mW ±25ppm/℃ ±0.1% 500kΩ 0603 Chip Resistor - Surface Mount ROHS", LCSC Part Number=C412382, Manufacturer="Viking Tech", Package=0603, ComponentLink1Description=LCSC, ComponentLink1URL=https://www.lcsc.com/product-detail/Chip-Resistor-Surface-Mount_Viking-Tech-AR03BTC5003N_C412382.html, Item Type=Resistor, Manufacturer Part Number=AR03BTC5003N
R64: library part AR05BTCW4003, "125mW ±25ppm/℃ ±0.1% 400kΩ 0805 Chip Resistor - Surface Mount ROHS", LCSC Part Number=C3013969, Manufacturer="Viking Tech", Package=0805, ComponentLink1Description=LCSC, ComponentLink1URL=https://www.lcsc.com/product-detail/Chip-Resistor-Surface-Mount_Viking-Tech-AR05BTCW4003_C3013969.html, Item Type=Resistor, Manufacturer Part Number=AR05BTCW4003
R67: library part AR05BTCW1253, "125mW Thin Film Resistor 100V ±25ppm/℃ ±0.1% 125kΩ 0805 Chip Resistor - Surface Mount ROHS", LCSC Part Number=C316205, Manufacturer="Viking Tech", Package=0805, ComponentLink1Description=LCSC, ComponentLink1URL=https://www.lcsc.com/product-detail/Chip-Resistor-Surface-Mount_Viking-Tech-AR05BTCW1253_C316205.html, Item Type=Resistor, Manufacturer Part Number=AR05BTCW1253
SW1: library part EVQ-P7J01P, "SWITCH TACTILE SPST-NO 0.05A 12V", Actuator Color=Black, Case/Package=SMD/SMT, Contact Current Rating=50mA, Contact Resistance=500mR, Manufacturer=Panasonic, Max Operating Temperature=70°C, Max Voltage Rating (DC)=12V, Min Operating Temperature=-20°C, Operating Force=1.6N, Package Quantity=5000, Supplier Part Number=667-EVQP7J01P, Actuator Length=0.65mm, Category="Tactile Switches", ComponentLink1Description=https://datasheet.ciiva.com/24076/atv0000ce4-259034-24076561.pdf?src-supplier=Mouser, ComponentLink1URL=https://datasheet.ciiva.com/24076/atv0000ce4-259034-24076561.pdf?src-supplier=Mouser, ComponentLink2Description=https://datasheet.ciiva.com/22777/atk0000ce20-22777575.pdf?src-supplier=Farnell, ComponentLink2URL=https://datasheet.ciiva.com/22777/atk0000ce20-22777575.pdf?src-supplier=Farnell, ComponentLink3Description=https://datasheet.ciiva.com/29974/atk0000ce20-29974069.pdf?src-supplier=Avnet, ComponentLink3URL=https://datasheet.ciiva.com/29974/atk0000ce20-29974069.pdf?src-supplier=Avnet, ComponentLink4Description=https://datasheet.ciiva.com/30252/atk0000ce20-30252044.pdf?src-supplier=Onlinecomponents.com, ComponentLink4URL=https://datasheet.ciiva.com/30252/atk0000ce20-30252044.pdf?src-supplier=Onlinecomponents.com, Current Rating=50mA, Electrical Life=100000Cycles, Height=1.35mm, Illumination Type=Non-Illuminated, Item Type=SWITCH, Lead Free="Lead Free", Length=3.5mm, Manufacturer Part Number=EVQ-P7J01P, Mechanical Life=100000Cycles, Mounting Technology="Surface Mount", Orientation="Right Angle", Packaging="Tape and Reel", Pricing="1=0.28, 10=0.252, 50=0.252, 100=0.217, 1000=0.173, 10000=0.148 (USD)", Radiation Hardening=No, Reach SVHC Compliant=No, RoHS=Yes, RoHS Compliant=Yes, Series=EVQP7, Stock=9778, Supplier=Mouser, Switch Function=Off-Mom, Switch Travel=0.2mm, Termination="Gull Wing", Throw Configuration=SPST, Voltage Rating (DC)=12V, Width=2.9mm
SW2 SW3: "Switch Tactile N.O. SPST Round Button Gull Wing 0.05A 12VDC 100000Cycles 1.57N SMD", Case/Package=SMD/SMT, Color=White, Contact Current Rating=50mA, Contact Resistance=500mR, Manufacturer=E-Switch, Max Operating Temperature=85°C, Max Voltage Rating (DC)=12V, Min Operating Temperature=-35°C, Operating Force=160gf, Package Quantity=1, Supplier Part Number=9232661, Actuator Length=0.85mm, Actuator Material=Polyphthalamide, Actuator Type=Standard, Category="Tactile Switches", ComponentLink1Description=https://datasheet.ciiva.com/7637/tl3340-7637667.pdf?src-supplier=Element14, ComponentLink1URL=https://datasheet.ciiva.com/7637/tl3340-7637667.pdf?src-supplier=Element14, ComponentLink2Description=https://datasheet.ciiva.com/5284/tl3340-28153-5284108.pdf?src-supplier=Mouser, ComponentLink2URL=https://datasheet.ciiva.com/5284/tl3340-28153-5284108.pdf?src-supplier=Mouser, ComponentLink3Description=https://datasheet.ciiva.com/2900/p021301b-2900825.pdf?src-supplier=Digikey, ComponentLink3URL=https://datasheet.ciiva.com/2900/p021301b-2900825.pdf?src-supplier=Digikey, ComponentLink4Description=https://datasheet.ciiva.com/2900/p021301b-2900826.pdf?src-supplier=Digikey, ComponentLink4URL=https://datasheet.ciiva.com/2900/p021301b-2900826.pdf?src-supplier=Digikey, ComponentLink5Description=https://datasheet.ciiva.com/2900/p021301b-2900827.pdf?src-supplier=Digikey, ComponentLink5URL=https://datasheet.ciiva.com/2900/p021301b-2900827.pdf?src-supplier=Digikey, Contact Material="Stainless Steel,Silver", Contact Plating="Stainless Steel,Silver", Current Rating=50mA, Electrical Life=100000Cycles, Height=3.55mm, Housing Material=Polyphthalamide, Illumination Type=Non-Illuminated,Illuminated, Lead Free=5697LeadFree, Manufacturer Part Number=TL3340AF160QG, Mechanical Life=100000Cycles, Mounting Technology="Surface Mount", Number of Positions=2NUMBER, Orientation="Right Angle", Packaging="Tape and Reel", Pricing="2000=0.27 (USD)", Reach SVHC Compliant=No, RoHS=Yes, RoHS Compliant=Yes, Series=TL3340, Size=3.3mm, Stock=16000, Supplier="Future Electronics", Switch Function=Off-Mom, Switch Travel=0.2mm, Termination="Gull Wing", Throw Configuration=SPST, Voltage Rating (DC)=12V
U1: "IC REG BUCK ADJ 3A TSOT23-6", Case/Package=SOT-23-6, LCSC Part Number=C116592, Manufacturer="Texas Instruments", Max Input Voltage=17V, Max Operating Temperature=125°C, Max Output Voltage=7V, Min Input Voltage=4.5V, Min Operating Temperature=-40°C, Min Output Voltage=768mV, Output Current=3A, Quiescent Current=400uA, Supplier Part Number 1=296-47238-6-ND, Switching Frequency=580kHz, ComponentLink1Description=http://www.ti.com/lit/ds/symlink/tps563201.pdf?src-supplier=Digi-Key, ComponentLink1URL=http://www.ti.com/lit/ds/symlink/tps563201.pdf?src-supplier=Digi-Key, ComponentLink2Description=http://www.ti.com/general/docs/suppproductinfo.tsp?distId=10&amp;gotoUrl=http%3A%2F%2Fwww.ti.com%2Flit%2Fgpn%2Ftps563201&src-supplier=Digi-Key, ComponentLink2URL=http://www.ti.com/general/docs/suppproductinfo.tsp?distId=10&amp;gotoUrl=http%3A%2F%2Fwww.ti.com%2Flit%2Fgpn%2Ftps563201&src-supplier=Digi-Key, ComponentLink3Description=http://www.ti.com/lit/gpn/tps563201?src-supplier=Mouser, ComponentLink3URL=http://www.ti.com/lit/gpn/tps563201?src-supplier=Mouser, Item Type=IC, Lead Free="Lead Free", Manufacturer Part Number=TPS563201DDCR, Mount="Surface Mount", Number of Outputs=1, Number of Pins=6, Output Configuration=Positive, Output Type=Adjustable, Packaging="Tape and Reel", Pricing 1="1=0.92, 10=0.812, 25=0.7628, 100=0.5781, 250=0.492, 500=0.4674, 1000=0.3567 (USD)", Stock 1=0, Supplier 1=Digi-Key, Synchronous Rectifier=Yes
U2: "IC BUF NON-INVERT 5.5V SOT23-5", Case/Package=SOT-23-5, High Level Output Current=-8mA, LCSC Part Number=C100024, Low Level Output Current=8mA, Manufacturer="Texas Instruments", Max Operating Temperature=125°C, Max Supply Voltage=5.5V, Min Operating Temperature=-40°C, Min Supply Voltage=1.6V, Package Quantity=3000, Quiescent Current=1uA, Supplier Part Number 1=296-37176-6-ND, ComponentLink1Description=http://www.ti.com/lit/pdf/sdyu001?src-supplier=Digi-Key, ComponentLink1URL=http://www.ti.com/lit/pdf/sdyu001?src-supplier=Digi-Key, ComponentLink2Description=http://www.ti.com/lit/ds/symlink/sn74lv1t34.pdf?src-supplier=Avnet, ComponentLink2URL=http://www.ti.com/lit/ds/symlink/sn74lv1t34.pdf?src-supplier=Avnet, Item Type=IC, Lead Free="Lead Free", Logic Function=Buffer,Inverting, Manufacturer Part Number=SN74LV1T34DBVR, Mount="Surface Mount", Number of Bits=1, Number of Bits per Element=1, Number of Channels=1, Number of Elements=1, Number of Input Lines=1, Number of Inputs=1, Number of Output Lines=1, Number of Outputs=1, Number of Pins=5, Operating Supply Current=8mA, Packaging="Tape and Reel", Polarity=Non-Inverting, Pricing 1="1=0.43, 10=0.349, 25=0.3192, 100=0.2374, 250=0.2152, 500=0.17808, 1000=0.13356 (USD)", Propagation Delay=15.5ns, Radiation Hardening=No, REACH SVHC="No SVHC", RoHS Compliant=Yes, Stock 1=37360, Supplier 1=Digi-Key, Weight=0.000353oz
U3: "Rectifier Diode, 1 Phase, 1 Element, 2A, 400V V(RRM), Silicon, DO-15", Manufacturer="Raspberry Pi", Supplier Part Number=3766079, Category=Uncategorized, Manufacturer Part Number=RP2040TR7, Pricing="500=0.645 (GBP)", RoHS=No, Stock=11495, Supplier=Farnell
U4: "IC FLASH 16MBIT SPI/QUAD 8USON", Manufacturer=Winbond, Supplier Part Number=256-W25Q16JVUXIQTRCT-ND, Category=Memory, Manufacturer Part Number="W25Q16JVUXIQ TR", Pricing="1=0.56, 10=0.51, 25=0.504, 50=0.501, 100=0.4479, 250=0.44416, 500=0.43758, 1000=0.42193 (USD)", RoHS=No, Stock=47295, Supplier=Digi-Key
U5 U7 U12 U13: "Colorless transparence -40℃~+150℃ 正贴 RGB 120° 1010 Light Emitting Diodes (LED) ROHS", LCSC Part Number=C5349953, Manufacturer=XINGLIGHT, Package=1010, ComponentLink1Description=LCSC, ComponentLink1URL=https://www.lcsc.com/product-detail/span-style-background-color-ff0-RGB-span-LEDs-Built-in-IC_XINGLIGHT-XL-1010RGBC-WS2812B_C5349953.html, Item Type="RGB LED", Manufacturer Part Number=XL-1010RGBC-WS2812B
U6: "Intelligent WiFiI Module 1200M Dual Band+AC (High Power)", ComponentLink1Description=Aliexpress, ComponentLink1URL=https://www.aliexpress.com/item/1005005638445796.html?spm=a2g0o.order_list.order_list_main.29.65f179d27FZF0V&gatewayAdapt=glo2nld, Item Type=Module, Manufacturer Part Number=BL-R8812AF1
U8: "IC HUB CONTROLLER USB 64VQFN", LCSC Part Number=C486066, Manufacturer="Texas Instruments", ComponentLink1Description=http://www.ti.com/general/docs/suppproductinfo.tsp?distId=10&amp;gotoUrl=http%3A%2F%2Fwww.ti.com%2Flit%2Fgpn%2Ftusb8041&src-supplier=Digikey, ComponentLink1URL=http://www.ti.com/general/docs/suppproductinfo.tsp?distId=10&amp;gotoUrl=http%3A%2F%2Fwww.ti.com%2Flit%2Fgpn%2Ftusb8041&src-supplier=Digikey, ComponentLink2Description=http://www.ti.com/lit/ds/symlink/tusb8041.pdf?src-supplier=Digikey, ComponentLink2URL=http://www.ti.com/lit/ds/symlink/tusb8041.pdf?src-supplier=Digikey, ComponentLink3Description=http://www.ti.com/lit/gpn/tusb8041?src-supplier=Mouser, ComponentLink3URL=http://www.ti.com/lit/gpn/tusb8041?src-supplier=Mouser, ComponentLink4Description=http://www.ti.com/general/docs/lit/getliterature.tsp?genericPartNumber=TUSB8041&&fileType=pdf&src-supplier=Avnet, ComponentLink4URL=http://www.ti.com/general/docs/lit/getliterature.tsp?genericPartNumber=TUSB8041&&fileType=pdf&src-supplier=Avnet, Height=1mm, Item Type=IC, Length=9mm, Manufacturer Part Number=TUSB8041RGCR, Pricing="1=6.99, 10=6.39, 50=6.12, 100=5.43, 1000=4.5, 10000=4.34 (USD)", RoHS=Yes, Stock=5065, Supplier=Mouser, Thickness=880um, Width=9mm
U9: "IC DRP PORT CTLR USB-C 30WQFN", LCSC Part Number=C701817, Manufacturer="Texas Instruments", ComponentLink1Description=http://www.ti.com/lit/gpn/hd3ss3220?src-supplier=Mouser, ComponentLink1URL=http://www.ti.com/lit/gpn/hd3ss3220?src-supplier=Mouser, ComponentLink2Description=http://www.ti.com/lit/ds/symlink/hd3ss3220.pdf?src-supplier=Digikey, ComponentLink2URL=http://www.ti.com/lit/ds/symlink/hd3ss3220.pdf?src-supplier=Digikey, ComponentLink3Description=http://www.ti.com/general/docs/suppproductinfo.tsp?distId=10&amp;gotoUrl=http%3A%2F%2Fwww.ti.com%2Flit%2Fgpn%2Fhd3ss3220&src-supplier=Digikey, ComponentLink3URL=http://www.ti.com/general/docs/suppproductinfo.tsp?distId=10&amp;gotoUrl=http%3A%2F%2Fwww.ti.com%2Flit%2Fgpn%2Fhd3ss3220&src-supplier=Digikey, Item Type=IC, Manufacturer Part Number=HD3SS3220IRNHR, Pricing="1=3.3, 10=2.29, 50=2.29, 100=2.03, 1000=1.8, 10000=1.62 (USD)", RoHS=Yes, Stock=2435, Supplier=Mouser
U10: "IC REG BUCK ADJ 2A SOT23-5", LCSC Part Number=C141836, Manufacturer="Texas Instruments", ComponentLink1Description=http://www.ti.com/lit/ds/symlink/tlv62569.pdf?src-supplier=Farnell, ComponentLink1URL=http://www.ti.com/lit/ds/symlink/tlv62569.pdf?src-supplier=Farnell, ComponentLink2Description=http://www.ti.com/lit/ds/symlink/tlv62569.pdf?src-supplier=Digikey, ComponentLink2URL=http://www.ti.com/lit/ds/symlink/tlv62569.pdf?src-supplier=Digikey, Item Type=IC, Manufacturer Part Number=TLV62569DBVR, Pricing="1=0.47, 10=0.248, 50=0.248, 100=0.143, 1000=0.12, 10000=0.086 (USD)", RoHS=Yes, Stock=6385, Supplier=Mouser
U11: "IC PWR SWITCH N-CHAN 1:2 10VSON", LCSC Part Number=C2149914, Manufacturer="Texas Instruments", ComponentLink1Description=https://datasheet.ciiva.com/6602/tps2003c-6602992.pdf?src-supplier=Digikey, ComponentLink1URL=https://datasheet.ciiva.com/6602/tps2003c-6602992.pdf?src-supplier=Digikey, Item Type=IC, Manufacturer Part Number=TPS2003CDRCR, Pricing="1=1.5, 10=1.07, 50=1.07, 100=0.867, 1000=0.723, 10000=0.5 (USD)", RoHS=Yes, Stock=5869, Supplier=Mouser
U14: "30V 5A 2.3W 30mΩ@4A,8V null WSON-6 MOSFETs ROHS", LCSC Part Number=C2863837, Manufacturer="Texas Instruments", Supplier Part Number=595-CSD17313Q2, Category=MOSFETs, ComponentLink1Description=https://datasheet.ciiva.com/6388/csd17313q2-6388183.pdf?src-supplier=Digi-Key, ComponentLink1URL=https://datasheet.ciiva.com/6388/csd17313q2-6388183.pdf?src-supplier=Digi-Key, ComponentLink2Description=https://datasheet.ciiva.com/4438/slps260b-128048-4438543.pdf?src-supplier=Mouser, ComponentLink2URL=https://datasheet.ciiva.com/4438/slps260b-128048-4438543.pdf?src-supplier=Mouser, ComponentLink3Description=https://datasheet.ciiva.com/1255/csd17313q2-1255358.pdf?src-supplier=Newark, ComponentLink3URL=https://datasheet.ciiva.com/1255/csd17313q2-1255358.pdf?src-supplier=Newark, ComponentLink4Description=https://datasheet.ciiva.com/7968/1536237-7968249.pdf?src-supplier=Element14, ComponentLink4URL=https://datasheet.ciiva.com/7968/1536237-7968249.pdf?src-supplier=Element14, Item Type=IC, Manufacturer Part Number=CSD17313Q2, Pricing="1=0.59, 10=0.502, 50=0.502, 100=0.375, 1000=0.228, 10000=0.156 (USD)", RoHS=Yes, Stock=12528, Supplier=Mouser
U15: "IC HOT SWAP CTRLR GP 16QFN", Manufacturer="Texas Instruments", Supplier Part Number=595-TPS25910RSAT, ComponentLink1Description=http://components.arrow.com/part/dataview/56333867S341209N7713?src-supplier=Arrow+Electronics, ComponentLink1URL=http://components.arrow.com/part/dataview/56333867S341209N7713?src-supplier=Arrow+Electronics, ComponentLink2Description=http://www.ti.com/general/docs/lit/getliterature.tsp?genericPartNumber=TPS25910&&fileType=pdf&src-supplier=Avnet, ComponentLink2URL=http://www.ti.com/general/docs/lit/getliterature.tsp?genericPartNumber=TPS25910&&fileType=pdf&src-supplier=Avnet, ComponentLink3Description=http://www.ti.com/lit/gpn/tps25910?src-supplier=Mouser, ComponentLink3URL=http://www.ti.com/lit/gpn/tps25910?src-supplier=Mouser, ComponentLink4Description=http://www.ti.com/general/docs/lit/getliterature.tsp?genericPartNumber=TPS25910&amp;&amp;fileType=pdf&src-supplier=Farnell, ComponentLink4URL=http://www.ti.com/general/docs/lit/getliterature.tsp?genericPartNumber=TPS25910&amp;&amp;fileType=pdf&src-supplier=Farnell, ComponentLink5Description=http://www.ti.com/lit/ds/symlink/tps25910.pdf?src-supplier=Digikey, ComponentLink5URL=http://www.ti.com/lit/ds/symlink/tps25910.pdf?src-supplier=Digikey, ComponentLink6Description=http://www.ti.com/general/docs/lit/getliterature.tsp?genericPartNumber=TPS25910&&fileType=pdf&src-supplier=Element14, ComponentLink6URL=http://www.ti.com/general/docs/lit/getliterature.tsp?genericPartNumber=TPS25910&&fileType=pdf&src-supplier=Element14, Item Type=IC, Manufacturer Part Number=TPS25910RSAT, Pricing="1=4.06, 10=2.81, 50=2.81, 100=2.33, 1000=1.86, 10000=1.72 (USD)", RoHS=Yes, Stock=1261, Supplier=Mouser
U16: "IC RTC CLK/CALENDAR I2C 8SOIC", Case/Package=SOIC, LCSC Part Number=C107410, Manufacturer=Maxim, Max Operating Temperature=85°C, Max Supply Voltage=5.5V, Min Operating Temperature=-40°C, Min Supply Voltage=2.3V, Operating Supply Voltage=3.3V, Package Quantity=1000, ComponentLink1Description=https://datasheet.ciiva.com/1243/ds3231m-1243728.pdf?src-supplier=Digikey, ComponentLink1URL=https://datasheet.ciiva.com/1243/ds3231m-1243728.pdf?src-supplier=Digikey, ComponentLink2Description=https://datasheet.ciiva.com/14244/ds3231m-14244349.pdf?src-supplier=Avnet, ComponentLink2URL=https://datasheet.ciiva.com/14244/ds3231m-14244349.pdf?src-supplier=Avnet, ComponentLink3Description=https://datasheet.ciiva.com/12291/ds3231m-35560-12291992.pdf?src-supplier=Mouser, ComponentLink3URL=https://datasheet.ciiva.com/12291/ds3231m-35560-12291992.pdf?src-supplier=Mouser, Date Format=YY-MM-DD-dd, Interface=I2C,Serial,2-Wire, Item Type=IC, Logic Function=Clock, Manufacturer Part Number=DS3231MZ+TRL, Mounting Technology="Surface Mount", Packaging="Tape and Reel", Pins=8, Pricing="1=12.6, 10=8.92, 50=7.97, 100=6.91, 1000=5.9, 10000=5.9 (USD)", Radiation Hardening=No, Reach SVHC Compliant=Unknown, RoHS=Yes, RoHS Compliant=Yes, Series=DS3231MZ, Stock=7947, Supplier=Mouser, Time Format="HH:MM:SS (12/24 hr)"
X1: library part MCSJK-7U-12.00-10-10-80-B-10, "Crystal, 12Mhz, 10Pf, 3.2Mm X 2.5Mm Frequency Nom 12Mhz Crystal Case Smd Rohs", Manufacturer=Multicomp, Supplier Part Number=56AC8904, ComponentLink1Description=http://www.farnell.com/datasheets/2645227.pdf?src-supplier=Farnell, ComponentLink1URL=http://www.farnell.com/datasheets/2645227.pdf?src-supplier=Farnell, Item Type=Crystal, Manufacturer Part Number=MCSJK-7U-12.00-10-10-80-B-10, Pricing="1=0.428, 10=0.381, 100=0.3, 500=0.246, 1000=0.214, 5000=0.191, 10000=0.172, 25000=0.166 (USD)", RoHS=Yes, Stock=26807, Supplier=Newark
X2: "24MHz 8pF ±10ppm SMD3225-4P Crystals ROHS", LCSC Part Number=C5241161, Manufacturer="Hosonic Elec", Package=SMD3225-4P, ComponentLink1Description=LCSC, ComponentLink1URL=https://www.lcsc.com/product-detail/Crystals_Hosonic-Elec-E3SB24E000009E_C5241161.html, Item Type=Crystal, Manufacturer Part Number=E3SB24E000009E

## Via types
v1: diameter 23.62, hole 11.81, Top Layer to Bottom Layer, tented both sides, 326 vias

## Nets (pads, with @x,y where several pads share a name; then routed paths per layer and width w, separated by ;. In a path a pad name is that pad's centre, name@x,y a point inside that pad or via, vN(x,y) a via of type N, cw(c..) or ccw(c..) an arc to the next point about the centre after c; other vN are vias at no path point)
1V1: C49.2 C50.2 C51.2 C52.2 C53.2 C54.2 C55.2 C56.2 C63.2 C64.2 L1.2 R67.2 U8.5 U8.8 U8.13 U8.21 U8.28 U8.31 U8.51 U8.57 | length 610.2
  Top Layer w7: C52.2@822.88,444.98 907.44,444.98 v1(907.86,445.4) ; C49.2@824.08,602.88 U8.5@875.77,602.88 v1(907.38,602.88) ; C53.2@827.79,544.05 828.03,543.82 U8.8@875.77,543.82 ; C51.2@981.48,320.48 U8.21@981.48,359.37 ; v1@1029.1,778.48 1029.1,741.8 1040.54,730.36 U8.57@1040.54,708.58 ; U8.28@1119.28,359.37 C50.2@1119.28,320.48 1120.2,319.56 1143.16,319.56 v1(1144.08,318.64) ; v1@1143.56,320.48 1144.08,321 1177.81,321 C54.2@1178.33,320.48 U8.31@1178.33,359.37 ; U8.51@1158.65,708.58 1158.65,745.76 v1(1177.37,764.48) C56.2@1177.37,780.98
  Top Layer w8: C51.2@990.48,320.48 991.4,319.56 1013.56,319.56 v1(1014.48,318.64) ; v1@1029.1,778.48 v1@1032.6,781.98 ; v1(1029.1,782.48) C55.2@1060.84,782.48
  other v1: 754.03,302.16 753.06,333.95
3220_ID: R46.1 R58.2 U9.27 U15.16 | length 663.8
  Top Layer w8: v1(378.93,699.01) R46.1@378.93,708.01 378.93,818.88 U15.16@380.44,820.39
  Power w8: v1(378.93,699.01) 378.93,1042.59 390.63,1054.29 v1@390.63,1068.54
  Bottom Layer w6: v1@390.63,1068.54 390.63,997.24 404.05,983.81 R58.2@442.55,983.81 ; U9.27@443.55,945.15 R58.2@443.55,983.81
  other v1: 390.63,1072.54
+1V1: C20.1 C26.2 C29.2 U3.23 U3.45 U3.50 | length 469.6
  Top Layer w8: v1(1676.83,972.06) C26.2@1676.83,1002.74 1676.83,1006.24 1696.39,1025.81 1696.39,1042.46 1704.36,1050.43 U3.23@1734.98,1050.43 ; v1(1968.76,1023.24) 1968.76,1021.7 1987.22,1003.24 2005.62,1003.24 U3.45@2005.69,1003.18 2045.88,1003.18 2140.83,908.23 C29.2@2140.83,896.55
  Power w12: v1(1968.76,1023.24) 2011.97,1023.24 2030.48,1041.75 2030.48,1089.23
  other v1: 2109.83,1095.6
+3V3: C11.2 C12.2 C15.2 C16.2 C19.2 C21.2 C22.1 C23.1 C24.2 C25.1 C30.2 C32.2 C33.2 C34.1 C35.1 C36.2 C45.1 C46.1 C47.1 C48.1 C61.1 C62.2 FB1.1 J1.8 J12.6 L2.2 P7.1 Q9.2 R3.2 R4.2 R10.2 R14.2 R15.2 R17.2 R21.2 R23.2 R24.2 R34.1 R35.2 R50.2 R54.2 R70.1 U3.1 U3.10 U3.22 U3.33 U3.42 U3.44 U3.48 U3.49 U4.8 U8.16 U8.34 U8.52 U8.63 U10.1 U10.4 U16.2 | length 4965.6
  Top Layer w7: FB1.1@665.12,822.7 682.74,805.08 v1@726.7,805.08 ; C48.1@822.79,386.05 823.08,386.34 U8.16@875.77,386.34 ; v1(1113.67,781.48) 1138.96,756.19 U8.52@1138.96,708.58 ; U8.34@1224.99,406.03 1273.21,406.03 1274.37,407.18 C47.1@1285.71,407.18 ; C47.1@1284.56,408.33 1282.8,410.09 1282.8,419.68 v1@1284.26,418.22 ; v1@1284.56,417.92 v1@1284.26,418.22 ; v1(1285.71,419.68) v1@1284.26,418.22 ; C25.1@1830.96,896.55 1848.4,896.55 v1(1859.18,885.77) ; C23.1@1972.7,896.55 1977.73,896.55 R17.2@2014.73,859.55 2010.89,855.7 v1@2010.89,831.39
  Top Layer w8: v1@827.79,359.88 C48.1@827.79,386.05 ; 907.38,756.98 922.43,741.93 U8.63@922.43,708.58 ; C46.1@1092.43,781.98 v1@1113.17,781.98 ; v1(1374.3,144.7) 1374.3,116.62 1395.92,95 1551,95 1559.34,86.66 J1.8@1559.34,47.97 ; C24.2@1676.32,1043.18 1676.32,1046.68 1695.81,1066.17 1785.7,1066.17 v1(1785.89,1065.99) ; C25.1@1830.96,904.54 U3.33@1830.96,938.69 ; U3.10@1830.96,1209.4 C21.2@1830.96,1302.33 1831.12,1302.49 1831.12,1329.36 v1(1831.28,1329.52) ; C23.1@1972.7,896.55 U3.42@1972.7,938.69 1972.63,938.76 1972.63,984.98 v1(1970.18,987.43) U3.44@2005.69,987.43 2043.24,987.43 2098.8,931.88 C30.2@2098.8,896.55 ; U3.1@1972.7,1209.4 1972.7,1222.69 2001.06,1251.05 2001.06,1305.46 2000.27,1306.26 v1(2000.27,1317.74) v1@2000.27,1322.74 ; U16.2@2211.39,420.08 2211.39,501.38 2251.97,541.96 R24.2@2362.23,541.96
  Top Layer w10: v1@726.7,805.08 v1(734.94,805.08) 819.78,805.08 C34.1@855.38,769.48 ; v1(2469.77,1069.23) 2524.39,1069.23 2534.98,1058.64 R21.2@2534.98,1030
  Top Layer w12: R54.2@1323.79,529.05 1323.84,529.1 1348.45,529.1 v1(1348.51,529.15)
  Top Layer w20: v1(77.66,314.05) 76.76,314.94 77.66,315.84 R3.2@77.66,325.58 ; v1(1222.5,846.12) 1222.5,819.27 R35.2@1222.79,818.98 ; v1(2065,56.24) 2084.19,56.24 J12.6@2084.19,58.94 ; R4.2@2555.49,675.45 v1(2555.49,703)